# Altium PCB Sound_Sensor_v3.1.PcbDoc (part 3 of 3)
Units mm, origin at the board's own origin, x right, y up, seen from the top; angles counter-clockwise.
Board outline 69.99 x 68.25 mm, 2 copper layers (Top Layer, Bottom Layer), stack 1.448 mm thick; 83 components, 60 nets, 303 pads, 87 vias.
Unrouted connection lines stored in the file: 2.
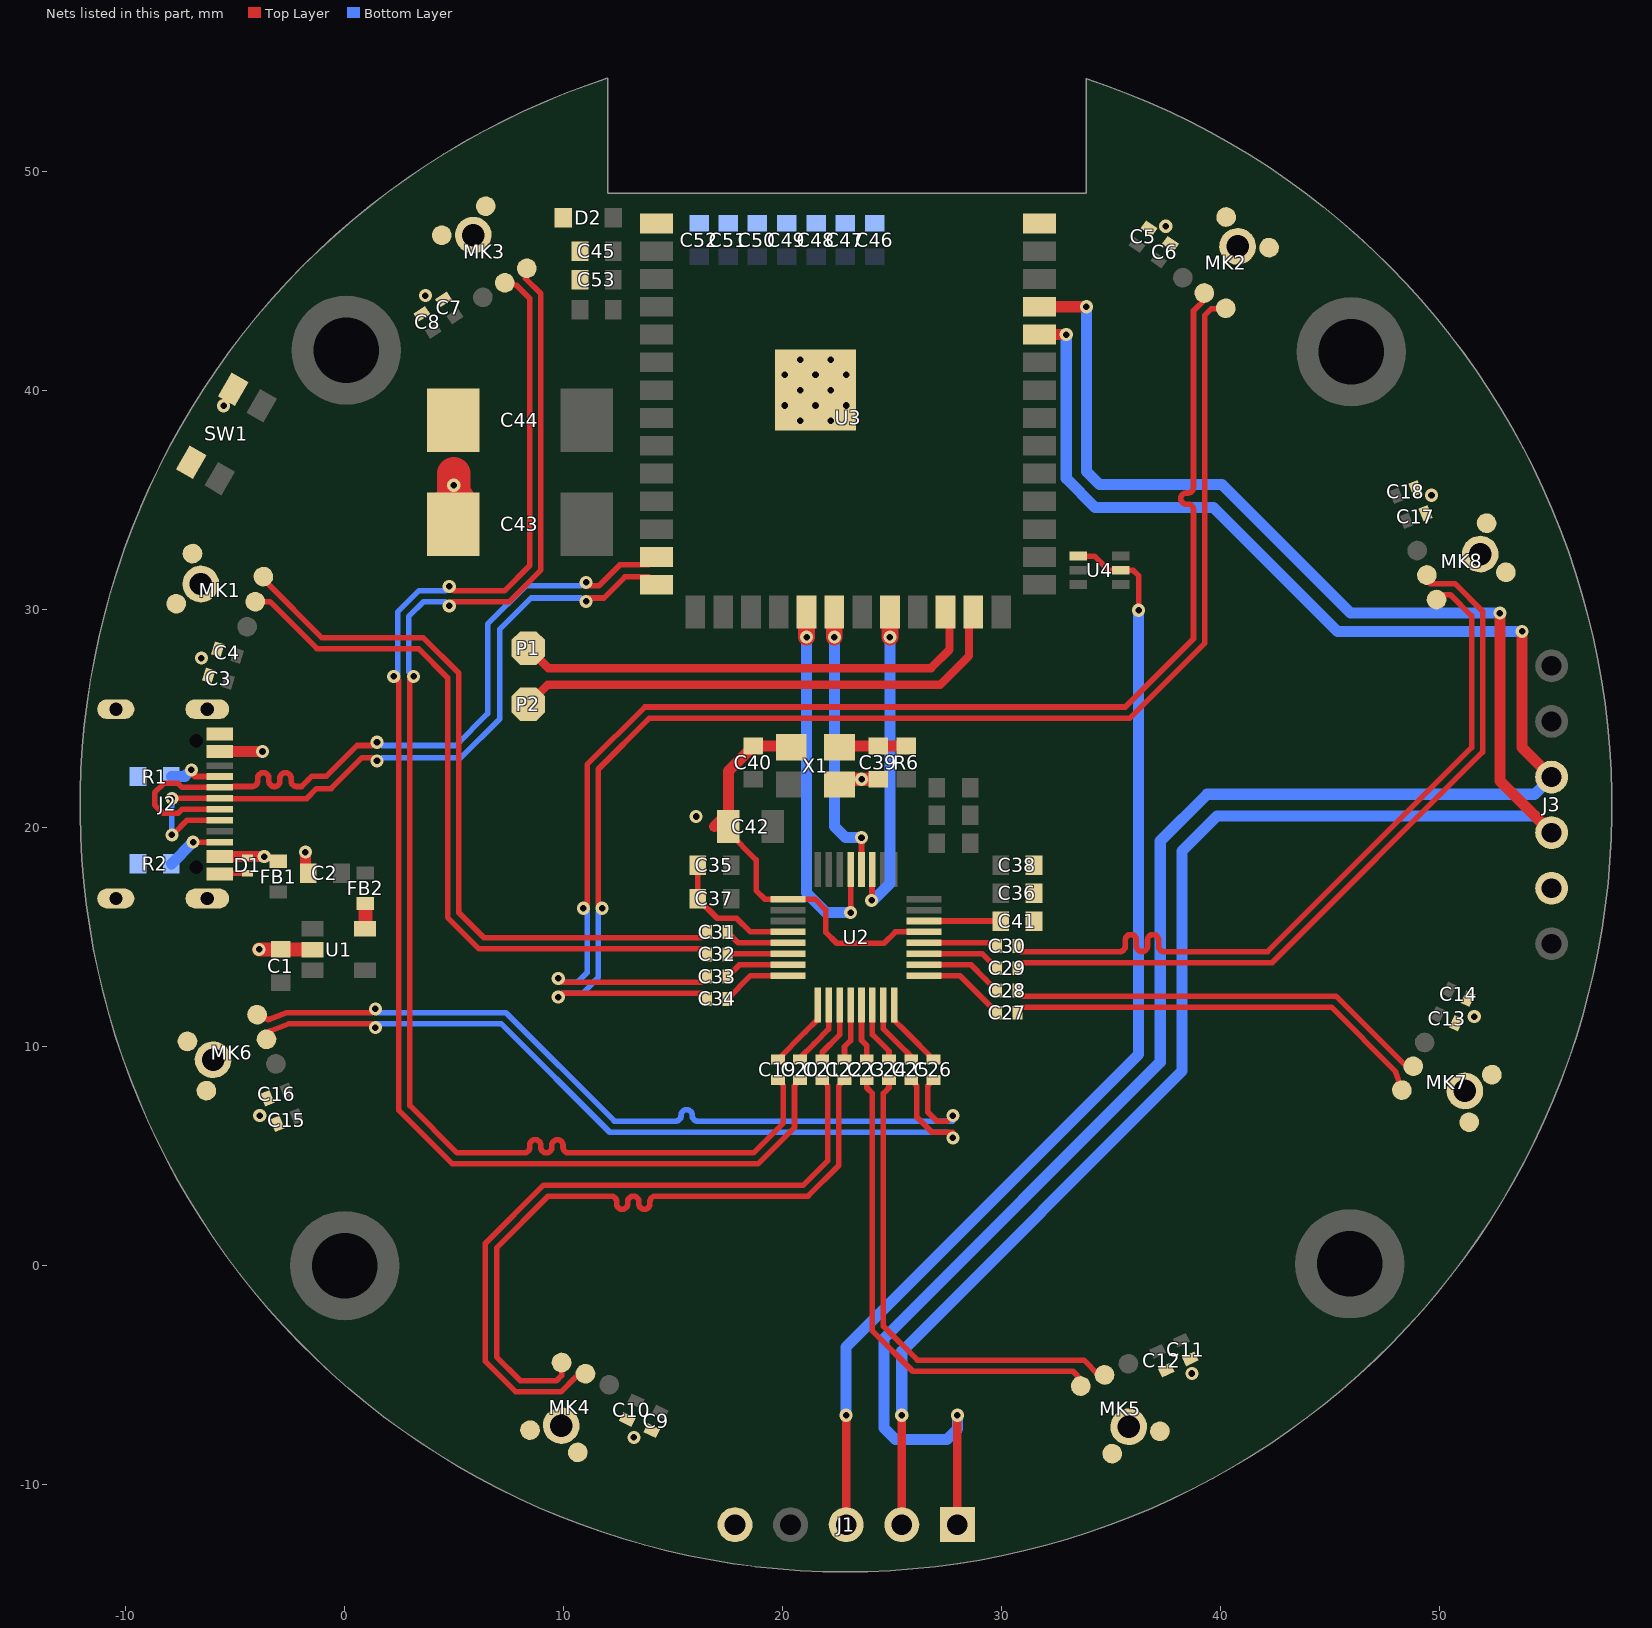
[diagram p2: the nets of this part, all layers, seen from the top]

## Via types
v1: diameter 0.6, hole 0.3, Top Layer to Bottom Layer, 87 vias

## Nets (pads, with @x,y where several pads share a name; then routed paths per layer and width w, separated by ;. In a path a pad name is that pad's centre, name@x,y a point inside that pad or via, vN(x,y) a via of type N, cw(c..) or ccw(c..) an arc to the next point about the centre after c; other vN are vias at no path point) (continued)
GND: C1.2 C2.2 C3.2 C4.2 C5.2 C6.2 C7.2 C8.2 C9.2 C10.2 C11.2 C12.2 C13.2 C14.2 C15.2 C16.2 C17.2 C18.2 C35.2 C36.2 C37.2 C38.2 C39.1 C40.1 C41.2 C42.1 C43.2 C44.2 C45.2 C46.2 C47.2 C48.2 C49.2 C50.2 C51.2 C52.2 C53.2 D1.1 D2.2 J1.5 J2.A1/B12 J2.B1/A12 J2.S1 J2.S2 J2.S3 J2.S4 J3.5 MK1.2 MK1.3 MK1.4 MK2.2 MK2.3 MK2.4 MK3.2 MK3.3 MK3.4 MK4.2 MK4.3 MK4.4 MK5.2 MK5.3 MK5.4 MK6.2 MK6.3 MK6.4 MK7.2 MK7.3 MK7.4 MK8.2 MK8.3 MK8.4 R1.1 R2.1 SW1.2 U1.2 U2.13 U2.25 U2.28 U3.1 U3.40 U3.41 X1.2 X1.4 | length 34.5
  Top Layer w0.254: J2.B1/A12@-5.712,17.902 -5.676,17.938 D1.1@-4.445,17.938 ; MK4.3@9.891,-7.307 MK4.3@9.891,-7.076 ; C35.2@16.129,18.288 C37.2@16.129,16.764 17.018,15.875 17.907,15.875 18.532,15.25 U2.28@20.26,15.25 ; C42.1@17.526,20.066 17.526,19.812 18.796,18.542 18.796,17.145 19.191,16.75 U2.25@20.26,16.75 21.477,16.75 21.971,16.256 21.971,15.24 22.479,14.732 24.638,14.732 25.156,15.25 U2.13@26.46,15.25 ; U3.41@21.463,40.005 U3.41@21.5,40.005
  Top Layer w0.508: v1(-1.803,18.898) -1.803,18.059 C2.2@-1.676,17.932 ; 16.891,20.066 17.526,20.701 17.526,22.606 C40.1@18.669,23.749 20.343,23.749 X1.2@20.406,23.686
  Top Layer w0.635: v1(-3.912,14.453) C1.2@-2.921,14.453 -1.484,14.453 U1.2@-1.473,14.442 ; X1.4@22.606,21.986 22.845,22.225 v1(23.615,22.225) C39.1@24.384,22.225
  Top Layer w1.524: C43.2@4.659,34.76 4.659,34.176 C43.2@4.951,33.884 ; 4.978,36.195 4.978,35.23 C43.2@5.156,35.052
  other v1: 13.208,-7.849 38.71,-4.928 -3.886,6.858 51.613,11.379 16.053,20.523 -6.553,27.762 49.657,35.204 4.978,35.662 20.808,38.605 22.208,38.605 -5.537,39.294 20.108,39.305 21.508,39.305 22.908,39.305 20.808,40.005 22.208,40.005 20.108,40.705 21.508,40.705 22.908,40.705 20.808,41.405 22.208,41.405 3.683,44.323 37.516,47.498
IO19: P1.1 U3.24 | length 21.8
  Top Layer w0.381: P1.1@8.382,28.219 9.296,27.305 26.797,27.305 27.635,28.143 27.635,29.68 U3.24@27.45,29.865
IO20: P2.1 U3.25 | length 23.1
  Top Layer w0.381: P2.1@8.382,25.654 9.271,26.543 27.203,26.543 28.524,27.864 28.524,29.669 U3.25@28.72,29.865
MIC_OUTS.OUT1_N: C32.1 MK1.6 | length 33.7
  Top Layer w0.254: MK1.6@-4.09,30.341 -3.417,30.341 -1.27,28.194 3.371,28.194 4.699,26.866 4.699,15.919 6.14,14.478 16.294,14.478 C32.1@16.548,14.224
MIC_OUTS.OUT1_P: C31.1 MK1.1 | length 33.7
  Top Layer w0.254: MK1.1@-3.718,31.486 -3.588,31.231 -1.06,28.702 3.581,28.702 5.207,27.076 5.207,16.129 6.35,14.986 16.294,14.986 C31.1@16.548,15.24
MIC_OUTS.OUT2_N: C33.1 MK2.6 | length 65
  Top Layer w0.254: v1(9.754,13.127) 9.927,12.954 16.294,12.954 C33.1@16.548,13.208 ; v1(10.906,16.332) 11.074,16.5 11.074,22.893 13.709,25.527 35.662,25.527 38.781,28.646 38.781,34.417 38.781,34.544 ccw(c38.527,34.544) 38.527,34.798 38.451,34.798 cw(c38.451,35.052) 38.451,35.306 38.527,35.306 ccw(c38.527,35.56) 38.781,35.56 38.781,36.321 38.781,43.632 39.321,44.173 MK2.6@39.276,44.445
  Bottom Layer w0.254: v1(9.754,13.127) 9.927,12.954 10.643,12.954 11.079,13.391 11.079,16.159 v1(10.906,16.332)
MIC_OUTS.OUT2_P: C34.1 MK2.1 | length 64.8
  Top Layer w0.254: v1(9.754,12.273) 9.927,12.446 16.294,12.446 C34.1@16.548,12.192 ; v1(11.76,16.332) 11.582,16.51 11.582,22.682 13.919,25.019 35.872,25.019 39.289,28.436 39.289,43.422 39.583,43.716 40.079,43.716 MK2.1@40.256,43.745 MK2.1@40.342,43.745
  Bottom Layer w0.254: v1@9.927,12.446 10.853,12.446 11.587,13.18 11.587,16.159 v1(11.76,16.332)
MIC_OUTS.OUT3_N: C20.1 MK3.6 | length 65.4
  Top Layer w0.254: v1@2.464,26.751 2.464,7.105 4.92,4.648 18.879,4.648 20.549,6.317 20.549,8.23 C20.1@20.803,8.484 ; v1(4.775,31.039) 4.978,30.836 7.29,30.836 8.453,31.999 8.453,44.201 7.854,44.8 MK3.6@7.315,44.91
  Bottom Layer w0.254: v1@2.291,26.924 2.413,27.046 2.413,29.865 3.396,30.848 4.585,30.848 v1(4.775,31.039)
  other v1: 2.235,26.924
MIC_OUTS.OUT3_P: C19.1 MK3.1 | length 65.8
  Top Layer w0.254: v1(3.145,26.924) 2.972,26.751 2.972,7.315 5.131,5.156 7.686,5.156 8.193,5.156 ccw(c8.193,5.41) 8.447,5.41 8.447,5.501 cw(c8.701,5.501) 8.955,5.501 8.955,5.41 ccw(c9.209,5.41) 9.463,5.41 9.463,5.501 cw(c9.717,5.501) 9.971,5.501 9.971,5.41 ccw(c10.225,5.41) 10.225,5.156 10.86,5.156 18.669,5.156 20.041,6.528 20.041,8.23 C19.1@19.787,8.484 ; v1@4.775,30.185 4.918,30.328 7.5,30.328 8.961,31.789 8.961,44.411 8.259,45.114 8.259,45.374 8.283,45.398 MK3.1@8.319,45.574
  Bottom Layer w0.254: v1(3.145,26.924) 2.921,27.148 2.921,29.654 3.607,30.34 4.585,30.34 v1(4.775,30.15)
MIC_OUTS.OUT4_N: C21.1 MK4.6 | length 31.8
  Top Layer w0.254: MK4.6@10.997,-4.936 10.546,-5.1 9.881,-5.766 7.816,-5.766 6.426,-4.376 6.426,1.023 9.086,3.683 20.955,3.683 22.073,4.801 22.073,8.23 C21.1@21.819,8.484
MIC_OUTS.OUT4_P: C22.1 MK4.1 | length 31.8
  Top Layer w0.254: MK4.1@9.905,-4.427 9.905,-5.023 9.67,-5.258 8.026,-5.258 6.934,-4.166 6.934,0.813 9.296,3.175 11.532,3.175 12.167,3.175 cw(c12.167,2.921) 12.421,2.921 12.421,2.827 ccw(c12.675,2.827) 12.929,2.827 12.929,2.921 cw(c13.183,2.921) 13.437,2.921 13.437,2.827 ccw(c13.691,2.827) 13.945,2.827 13.945,2.921 cw(c14.199,2.921) 14.199,3.175 15.022,3.175 21.165,3.175 22.581,4.59 22.581,8.23 C22.1@22.835,8.484
MIC_OUTS.OUT5_N: C24.1 MK5.6 | length 22.4
  Top Layer w0.254: C24.1@24.867,8.484 24.867,8.128 24.613,7.874 24.613,-2.769 26.162,-4.318 33.773,-4.318 34.447,-4.992 MK5.6@34.716,-4.992
MIC_OUTS.OUT5_P: C23.1 MK5.1 | length 22.4
  Top Layer w0.254: C23.1@23.851,8.484 23.851,8.128 24.105,7.874 24.105,-2.979 25.952,-4.826 33.274,-4.826 33.711,-5.263 MK5.1@33.625,-5.501
MIC_OUTS.OUT6_N: C25.1 MK6.6 | length 38
  Top Layer w0.254: MK6.6@-3.577,10.343 -3.406,10.728 -2.569,11.049 1.224,11.049 v1(1.397,10.876) ; C25.1@25.883,8.484 26.137,8.23 26.137,6.8 26.841,6.096 27.788,6.096 v1(27.788,5.842)
  Bottom Layer w0.254: v1(1.397,10.876) 1.397,10.944 1.502,11.049 7.156,11.049 12.109,6.096 27.534,6.096 v1(27.788,5.842)
MIC_OUTS.OUT6_P: C26.1 MK6.1 | length 38
  Top Layer w0.254: MK6.1@-4.009,11.467 -3.494,11.238 -2.664,11.557 1.224,11.557 v1(1.397,11.73) ; C26.1@26.899,8.484 26.645,8.23 26.645,7.01 27.051,6.604 27.534,6.604 v1(27.788,6.858)
  Bottom Layer w0.254: v1(1.397,11.73) 1.397,11.662 1.502,11.557 7.366,11.557 12.319,6.604 14.593,6.604 15.113,6.604 ccw(c15.113,6.858) 15.367,6.858 15.367,6.874 cw(c15.621,6.874) 15.875,6.874 15.875,6.858 ccw(c16.129,6.858) 16.129,6.604 16.764,6.604 27.788,6.604 v1(27.788,6.858)
MIC_OUTS.OUT7_N: C28.1 MK7.6 | length 19.6
  Top Layer w0.254: C28.1@30.734,12.573 30.988,12.319 45.288,12.319 48.583,9.024 MK7.6@48.823,9.109
MIC_OUTS.OUT7_P: C27.1 MK7.1 | length 19.5
  Top Layer w0.254: C27.1@30.734,11.557 30.988,11.811 45.078,11.811 47.997,8.892 MK7.1@48.305,8.022
MIC_OUTS.OUT8_N: C29.1 MK8.6 | length 35.2
  Top Layer w0.254: C29.1@30.734,13.589 30.734,13.678 30.899,13.843 32.967,13.843 42.374,13.843 51.994,23.462 51.994,29.794 51.994,29.903 50.731,31.166 49.599,31.166 MK8.6@49.444,31.558
MIC_OUTS.OUT8_P: C30.1 MK8.1 | length 35.1
  Top Layer w0.254: C30.1@30.734,14.605 30.734,14.516 30.899,14.351 34.864,14.351 35.409,14.351 ccw(c35.409,14.605) 35.663,14.605 35.663,14.877 cw(c35.917,14.877) 36.171,14.877 36.171,14.605 ccw(c36.425,14.605) 36.679,14.605 36.679,14.877 cw(c36.933,14.877) 37.187,14.877 37.187,14.605 ccw(c37.441,14.605) 37.441,14.351 38.076,14.351 42.164,14.351 51.486,23.673 51.486,29.693 50.521,30.658 50.106,30.658 MK8.1@49.886,30.438
MISO: U2.20 U3.20 | length 12.7
  Top Layer w0.254: U2.20@23.61,18.1 v1(23.61,19.558)
  Top Layer w0.762: v1(22.37,28.72) U3.20@22.37,29.865
  Bottom Layer w0.508: v1(22.37,28.72) 22.37,20.073 22.885,19.558 v1(23.61,19.558)
MOSI: U2.21 U3.19 | length 17.2
  Top Layer w0.254: v1(23.11,16.133) U2.21@23.11,18.1
  Top Layer w0.762: v1(21.1,28.72) U3.19@21.1,29.865
  Bottom Layer w0.508: v1(21.1,28.72) 21.1,17.025 21.992,16.133 v1(23.11,16.133)
NetC19_2: C19.2 U2.1 | length 3.2
  Top Layer w0.254: C19.2@19.787,9.423 21.031,10.668 21.61,11.247 U2.1@21.61,11.9
NetC20_2: C20.2 U2.2 | length 3
  Top Layer w0.254: C20.2@20.803,9.423 20.803,9.5 21.463,10.16 22.11,10.807 U2.2@22.11,11.9
NetC21_2: C21.2 U2.3 | length 2.8
  Top Layer w0.254: C21.2@21.819,9.423 21.819,9.754 22.61,10.545 U2.3@22.61,11.9
NetC22_2: C22.2 U2.4 | length 2.6
  Top Layer w0.254: C22.2@22.835,9.423 22.835,10.008 23.11,10.283 U2.4@23.11,11.9
NetC23_2: C23.2 U2.5 | length 2.6
  Top Layer w0.254: U2.5@23.61,11.9 23.61,10.299 23.851,10.058 C23.2@23.851,9.423
NetC24_2: C24.2 U2.6 | length 2.8
  Top Layer w0.254: U2.6@24.11,11.9 24.11,10.561 24.867,9.804 C24.2@24.867,9.423
NetC25_2: C25.2 U2.7 | length 3
  Top Layer w0.254: U2.7@24.61,11.9 24.61,10.823 25.26,10.173 25.883,9.55 C25.2@25.883,9.423
NetC26_2: C26.2 U2.8 | length 3.2
  Top Layer w0.254: U2.8@25.11,11.9 25.11,11.212 25.654,10.668 C26.2@26.899,9.423
NetC27_2: C27.2 U2.9 | length 4
  Top Layer w0.254: U2.9@26.46,13.25 28.101,13.25 28.651,12.7 C27.2@29.794,11.557
NetC28_2: C28.2 U2.10 | length 3.8
  Top Layer w0.254: U2.10@26.46,13.75 28.617,13.75 29.286,13.081 C28.2@29.794,12.573
NetC29_2: C29.2 U2.11 | length 3.6
  Top Layer w0.254: U2.11@26.46,14.25 28.168,14.25 29.133,14.25 C29.2@29.794,13.589
NetC30_2: C30.2 U2.12 | length 3.4
  Top Layer w0.254: U2.12@26.46,14.75 29.649,14.75 C30.2@29.794,14.605
NetC31_2: C31.2 U2.29 | length 3
  Top Layer w0.254: C31.2@17.488,15.24 17.978,14.75 U2.29@20.26,14.75
NetC32_2: C32.2 U2.30 | length 2.8
  Top Layer w0.254: C32.2@17.488,14.224 17.514,14.25 U2.30@20.26,14.25
NetC33_2: C33.2 U2.31 | length 3
  Top Layer w0.254: C33.2@17.488,13.208 18.03,13.75 U2.31@20.26,13.75
NetC34_2: C34.2 U2.32 | length 3.2
  Top Layer w0.254: C34.2@17.488,12.192 18.546,13.25 19.6,13.25 U2.32@20.26,13.25
NetC39_2: C39.2 R6.2 X1.1 | length 3.2
  Top Layer w0.508: X1.1@22.606,23.686 cw(c22.669,23.686) 22.669,23.749 C39.2@24.384,23.749 R6.2@25.654,23.749 R6.2@25.591,23.812
NetFB2_1: FB2.1 U1.5 | length 0.9
  Top Layer w0.381: U1.5@0.94,15.405 U1.5@0.927,15.392 U1.5@0.952,15.367
  Top Layer w0.635: U1.5@0.94,15.405 FB2.1@0.94,16.247
NetJ2_A5: J2.A5 R1.2 | length 2.7
  Top Layer w0.254: v1(-7.01,22.657) -7.061,22.657 -7.112,22.606 -6.858,22.352 J2.A5@-5.712,22.352
  Bottom Layer w0.508: R1.2@-7.925,22.352 -7.315,22.352 v1(-7.01,22.657)
NetJ2_B5: J2.B5 R2.2 | length 2.6
  Top Layer w0.254: v1(-6.931,19.352) J2.B5@-5.712,19.352
  Bottom Layer w0.508: R2.2@-7.925,18.364 -6.937,19.352 v1(-6.931,19.352) v1@-6.934,19.355
REFIN: C41.1 U2.14 | length 3.5
  Top Layer w0.254: U2.14@26.46,15.75 29.97,15.75 C41.1@29.972,15.748
RTS: J1.3 U4.1 U4.5 | length 52
  Top Layer w0.254: U4.1@33.523,32.425 34.25,32.425 34.9,31.775 U4.5@35.463,31.775 36.024,31.775 36.271,31.528 v1(36.271,29.947)
  Top Layer w0.381: J1.3@22.911,-11.837 v1(22.911,-6.833)
  Bottom Layer w0.508: v1(22.911,-6.833) 22.911,-3.719 36.271,9.641 v1(36.271,29.947)
RX: J1.1 J3.3 U3.36 | length 99.3
  Top Layer w0.381: J1.1@27.991,-11.837 v1(27.991,-6.833)
  Top Layer w0.508: U3.36@31.75,42.545 v1(32.969,42.545) ; v1@53.797,29.007 v1(53.797,28.981) 53.797,23.673 J3.3@55.144,22.327
  Bottom Layer w0.508: v1(27.991,-6.833) 27.991,-7.468 27.508,-7.95 25.171,-7.95 24.638,-7.417 24.638,-3.327 37.262,9.296 37.262,19.406 39.395,21.539 54.356,21.539 J3.3@55.144,22.327 ; v1(32.969,42.545) 32.969,35.966 34.29,34.646 39.691,34.646 45.355,28.981 53.086,28.981 ; 53.111,28.981 v1(53.797,28.981)
SCLK: U2.19 U3.22 | length 15
  Top Layer w0.254: v1(24.073,16.694) 24.091,16.713 24.091,18.081 U2.19@24.11,18.1
  Top Layer w0.762: v1(24.91,28.72) U3.22@24.91,29.865
  Bottom Layer w0.508: v1(24.073,16.694) 24.142,16.694 24.905,17.457 24.91,17.457 v1(24.91,28.72)
TX: J1.2 J3.4 U3.37 | length 96.2
  Top Layer w0.381: J1.2@25.451,-11.837 v1(25.451,-6.833)
  Top Layer w0.508: U3.37@31.75,43.815 33.858,43.815 v1@33.884,43.84 ; v1(52.781,29.819) 52.781,22.149 J3.4@55.144,19.787
  Bottom Layer w0.508: v1(25.451,-6.833) 25.451,-3.912 38.252,8.89 38.252,18.948 39.853,20.549 54.382,20.549 J3.4@55.144,19.787 ; v1@33.884,43.84 33.884,36.297 34.493,35.687 40.081,35.687 45.949,29.819 v1(52.781,29.819)
  other v1: 33.884,43.815
USB.USB_N: J2.A7 J2.B7 U3.13 | length 35
  Top Layer w0.254: J2.A7@-5.712,20.852 -7.438,20.852 -7.617,20.673 -8.303,20.673 -8.687,21.057 -8.687,21.615 -8.268,22.034 -7.617,22.034 -7.435,21.852 J2.B7@-5.712,21.852 ; -5.08,21.895 -4.36,21.895 -4.233,21.895 ccw(c-4.233,22.149) -3.979,22.149 -3.979,22.272 cw(c-3.725,22.272) -3.471,22.272 -3.471,22.149 ccw(c-3.217,22.149) -2.963,22.149 -2.963,22.272 cw(c-2.709,22.272) -2.455,22.272 -2.455,22.149 ccw(c-2.201,22.149) -2.201,21.895 -1.979,21.895 -1.682,22.192 -1.518,22.356 -0.853,22.356 0.561,23.77 1.232,23.77 1.38,23.917 v1(1.473,23.917) ; v1(11.029,31.221) 11.183,31.067 11.608,31.067 12.571,32.029 13.894,32.029 U3.13@14.25,32.385
  Bottom Layer w0.254: v1(1.473,23.917) 1.567,23.917 1.714,23.77 5.075,23.77 6.528,25.222 6.528,29.314 8.28,31.067 10.78,31.067 10.935,31.221 v1(11.029,31.221)
USB.USB_P: J2.A6 J2.B6 U3.14 | length 32.6
  Top Layer w0.254: v1(-7.899,21.354) -7.883,21.37 -7.864,21.352 J2.A6@-5.712,21.352 ; v1@-7.874,19.685 -7.207,20.352 J2.B6@-5.712,20.352 ; -5.08,21.336 -1.748,21.336 -1.287,21.797 -0.622,21.797 0.792,23.211 1.232,23.211 1.38,23.063 v1(1.473,23.063) ; v1(11.024,30.353) 11.178,30.508 11.839,30.508 12.802,31.471 13.894,31.471 U3.14@14.25,31.115
  Bottom Layer w0.254: v1(-7.899,19.685) v1(-7.899,21.354) ; v1(1.473,23.063) 1.567,23.063 1.714,23.211 5.307,23.211 7.087,24.991 7.087,29.083 8.511,30.508 10.775,30.508 10.93,30.353 v1(11.024,30.353)
VBUS: D1.2 FB1.1 J2.A4/B9 J2.B4/A9 | length 3.9
  Top Layer w0.254: v1@-3.766,23.502 v1(-3.759,23.495)
  Top Layer w0.508: J2.B4/A9@-5.712,18.702 -4.445,18.702 v1@-3.785,18.702 ; J2.A4/B9@-5.712,23.502 v1@-3.766,23.502
  other v1: -3.683,18.694
pads on no net: J2.A8 J2.B8 J2.MH U1.4 U2.27 U3.4 U3.5 U3.6 U3.7 U3.8 U3.9 U3.10 U3.11 U3.12 U3.15 U3.16 U3.23 U3.26 U3.28 U3.29 U3.30 U3.31 U3.32 U3.33 U3.34 U3.35 U3.38 U3.39

## Polygon pours and split planes (outlines as drawn)
no net on Bottom Overlay "NONET_L-01_P-001" (solid): 20.629,6.272 cw(c17.491,-3.963) 27.945,-1.653 cw(c37.111,-5.077) 30.998,2.564 30.993,2.589 30.634,5.637 28.248,3.097 28.224,3.072 ccw(c7.654,-13.269) 22.827,8.177
no net on Bottom Overlay "NONET_L-01_P-001" (solid): 23.62,-2.315 ccw(c26.878,2.498) 21.082,2.921 21.64,2.868 cw(c26.878,2.498) 24.269,-2.059
GND on Top Layer "GND_L01_P003" (solid, remove dead copper, pour order 3): 11.455,53.473 ccw(c22.928,20.991) 34.442,53.458 34.442,48.498 11.455,48.498
GND on Bottom Layer "GND_L02_P002" (solid, remove dead copper, pour order 2): 11.43,53.489 ccw(c22.903,21.007) 34.417,53.474 34.417,48.514 11.43,48.514

## Other copper
Top Layer:
  rectangle net VBUS: -3.683,18.18 -2.648,18.999
  rectangle net GND: -5.969,16.582 -5.531,17.704
  region net GND: 38.471,47.296 37.084,48.285 36.439,47.381 37.826,46.392
  region net GND: 50.308,34.506 49.683,36.091 48.718,35.711 49.342,34.125
  region net GND: 37.719,-5.74 39.263,-5.02 38.794,-4.014 37.25,-4.734
  region net 3V3: 35.727,-4.631 38.548,-3.316 38.079,-2.31 35.258,-3.625
  region net GND: 53.12,32.817 52.992,33.142 51.052,32.378 51.18,32.053
  region net GND: 9.253,-8.094 9.7,-8.302 10.454,-6.686 10.007,-6.478
  region net 3V3: 49.258,10.041 50.614,12.884 49.612,13.362 48.256,10.519
  region net 3V3: 11.862,-5.41 14.728,-6.747 15.197,-5.74 12.331,-4.404
  region net 3V3: -1.03,6.925 -2.149,9.841 -3.213,9.433 -2.094,6.516
  region net 3V3: -4.43,29.357 -5.404,26.359 -4.391,26.03 -3.417,29.028
  region net 3V3: 6.488,44.33 3.779,42.537 4.392,41.611 7.101,43.404
  region net 3V3: 49.118,32.496 47.939,35.489 46.755,35.023 47.934,32.03
  region net 3V3: 38.436,45.039 35.943,46.817 35.298,45.913 37.791,44.135
  region net GND: -5.406,39.941 -7.08,37.04 -6.715,36.829 -5.04,39.729
  region net "DEBUG SIG.ENABLE": -4.15,39.122 -5.825,36.221 -5.454,36.007 -3.779,38.908
  rectangle net GND: -5.969,24.5 -5.531,25.497
  region net GND: 16.311,18.732 17.03,19.451 16.491,19.99 15.773,19.271
  rectangle net GND: 15.748,19.304 18.034,20.828
  rectangle net GND: 15.748,16.319 16.51,20.828
  rectangle net 3V3: 28.194,16.713 30.353,22.098
  rectangle net 3V3: 29.591,17.018 30.353,18.288
  rectangle net GND: 3.988,33.325 5.918,39.243
  rectangle net 3V3: 10.084,33.172 12.014,39.091
  region net GND: -6.611,28.646 -7.137,27.026 -6.161,26.708 -5.634,28.329
  region net GND: -2.827,6.341 -3.438,7.932 -4.549,7.505 -3.938,5.914
  region net GND: 12.294,-7.772 13.838,-8.493 14.307,-7.486 12.763,-6.766
  region net GND: 51.528,10.46 52.261,11.998 51.259,12.476 50.526,10.938
  region net GND: 7.639,-8.043 10.764,-9.5 11.517,-7.884 8.392,-6.427
  region net GND: 51.936,5.696 53.436,8.84 50.577,10.204 49.077,7.059
  region net GND: 34.934,-9.593 38.092,-8.121 36.753,-5.25 33.595,-6.722
  region net GND: -8.181,10.443 -6.932,7.19 -3.975,8.325 -5.224,11.578
  region net GND: -7.605,33.325 -8.682,30.011 -5.669,29.032 -4.592,32.346
  region net GND: 54.034,31.515 52.77,34.723 50.83,33.959 52.094,30.75
  region net GND: 6.417,49.428 3.511,47.505 5.259,44.864 8.165,46.787
  region net GND: 4.216,45.061 2.795,44.12 3.408,43.194 4.829,44.135
  region net GND: 43.165,46.894 40.328,48.917 38.502,46.357 41.338,44.334
  rectangle net 5V: -3.454,15.367 -0.279,16.942
  rectangle net 3V3: -0.533,17.947 1.346,19.202
  rectangle net 5V: -3.378,12.548 -0.279,13.36
Bottom Layer:
  rectangle net VBUS: -4.293,18.237 -3.226,23.927

## Silkscreen, mask and mechanical layers (free items; w line width, h text height)
Top Overlay:
  lines w0.127: -1.372,17.399 -0.457,17.399 ; -1.372,18.466 -1.016,18.466 ; -0.508,19.685 -1.016,19.685 -1.016,18.542 -1.016,18.466 ; -0.457,18.466 -1.016,18.466 ; 8.814,47.295 8.814,46.615 10.262,46.615 ; 9.322,44.577 9.322,45.013 10.236,45.013 ; 11.112,48.616 11.112,49.136 ; 11.506,42.469 11.506,43.155 ; 15.138,16.942 15.646,16.942 15.646,16.764 ; 15.57,15.443 16.231,15.443 16.231,15.24 ; 15.85,14.122 16.231,14.122 16.231,14.224 ; 15.926,13.056 16.231,13.056 16.231,13.208 ; 16.764,21.717 17.399,21.717 17.399,20.93 17.424,20.93 ; 17.805,12.192 18.364,12.192 18.364,11.608 ; 18.567,7.849 18.567,8.42 19.38,8.42 ; 21.819,8.166 21.869,8.166 21.869,4.902 ; 23.851,8.166 23.901,8.166 23.901,4.902 ; 26.063,7.747 26.063,8.166 ; 26.873,8.166 26.899,8.166 ; 27.305,8.42 28.092,8.42 ; 28.679,22.377 28.702,22.377 28.702,22.733 29.464,22.733 ; 29.032,19.52 29.464,19.52 ; 29.032,20.889 29.439,20.889 ; 31.051,13.462 34.544,13.462 ; 31.051,14.385 31.051,14.351 31.42,14.351
  lines w0.254: 3.81,23.876 10.414,23.876 10.414,29.718 3.81,29.718 3.81,23.876 ; 16.51,-13.107 29.261,-13.107 29.261,-6.096 16.51,-6.096 16.51,-13.107 ; 49.124,13.437 56.464,13.437 56.464,28.702 49.124,28.702 49.124,13.437
  text "EN" at 51.003,26.772 h1.52
  text "IO_0" at 50.595,24.087 h1.52
  text "RX" at 51.601,21.692 h1.52
  text "TEST POINTs" at 3.048,20.066 h2.29
  text "TX" at 51.682,19.075 h1.52
  text "DEBUG" at 49.251,17.018 h2.29 r90
  text "GND" at 50.495,16.459 h1.52
  text "3V3" at 50.978,13.919 h1.52
  text "USB" at -7.823,11.811 h2.29 r90
  text "PROGRAMMING" at 15.001,-6.291 h2.29
  text "GND" at 18.509,-10.549 h1.52 r90
  text "DTR" at 21.049,-10.549 h1.52 r90
  text "RTS" at 23.589,-10.549 h1.52 r90
  text "TX" at 26.129,-10.549 h1.52 r90
  text "RX" at 28.669,-10.549 h1.52 r90
Bottom Overlay:
  lines w0.127: 28.224,3.072 ccw(c7.655,-13.269) 22.827,8.177 20.629,6.272 cw(c17.491,-3.963) 27.945,-1.653 cw(c37.111,-5.077) 30.998,2.564 ; 28.248,3.097 30.634,5.637 30.993,2.589 ; 21.082,2.921 cw(c26.878,2.498) 23.62,-2.315 24.269,-2.059 ccw(c26.878,2.498) 21.64,2.868 21.082,2.921
  lines w0.254: 16.51,-13.106 29.261,-13.106 29.261,-10.566 16.51,-10.566 16.51,-13.106 ; 53.874,13.386 56.464,13.386 56.464,28.677 53.874,28.677 53.874,13.386
  text "EN" at 53.874,26.772 h1.52
  text "IO_0" at 53.874,24.113 h1.52
  text "RX" at 53.874,21.692 h1.52
  text "TX" at 53.874,19.101 h1.52
  text "GND" at 53.874,16.434 h1.52
  text "3V3" at 53.874,13.894 h1.52
  text "RoHS" at 24.935,0.33 h6
  text "compliant" at 24.859,-1.733 h3.2
  text "ZERO CARBON FOOTPRINT" at 33.647,-4.879 h1.02
  text "GND" at 16.959,-10.473 h1.52 r270
  text "DTR" at 19.55,-10.473 h1.52 r270
  text "RTS" at 22.065,-10.473 h1.52 r270
  text "TX" at 24.63,-10.473 h1.52 r270
  text "RX" at 27.17,-10.473 h1.52 r270
DIMENSION:
  text "PCB Diameter" at -60.408,6.67 h6
BOARD OUTLINE:
  the board outline again, w0.254
FABRICATION:
  drawing of 191 lines, arcs and shapes, not listed
  text "Layer" at -34.916,83.82 h1.52
  text "Name" at -24.505,83.82 h1.52
  text "Material" at -0.889,83.82 h1.52
  text "Thickness" at 20.949,83.82 h1.52
  text "Constant" at 37.455,83.82 h1.52
  text "Board Layer Stack" at 51.929,83.82 h1.52
  text "Top Overlay" at -24.505,80.772 h1.52
  text "Top Solder" at -24.505,77.724 h1.52
  text "Solder Resist" at -0.889,77.724 h1.52
  text "0.076mm" at 20.949,77.724 h1.52
  text "3.5" at 37.455,77.724 h1.52
  text "1" at -34.916,74.676 h1.52
  text "Top Layer" at -24.505,74.676 h1.52
  text "0.254mm" at 20.949,74.676 h1.52
  text "Dielectric 1" at -24.505,71.628 h1.52
  text "FR-4" at -0.889,71.628 h1.52
  text "0.940mm" at 20.949,71.628 h1.52
  text "4.8" at 37.455,71.628 h1.52
  text "2" at -34.916,68.58 h1.52
  text "Bottom Layer" at -24.505,68.58 h1.52
  text "0.254mm" at 20.949,68.58 h1.52
  text "Bottom Solder" at -24.505,65.532 h1.52
  text "Solder Resist" at -0.889,65.532 h1.52
  text "0.076mm" at 20.949,65.532 h1.52
  text "3.5" at 37.455,65.532 h1.52
  text "Bottom Overlay" at -24.505,62.484 h1.52
  text "Total board thickness:" at -34.916,59.436 h1.52
  text "1.600mm" at 20.949,59.436 h1.52
Drill Drawing:
  circle w0.254: c-34.427,102.826 r0.847
  lines w0.254: -35.273,98.17 -33.58,98.17 -33.58,99.863 -35.273,99.863 -35.273,98.17 ; -35.273,106.213 -34.85,106.213 -34.427,105.79 -34.003,106.213 -33.58,106.213 -34.003,106.636 -33.58,107.06 -34.003,107.06 -34.427,107.483 -34.85,107.06 -35.273,107.06 -34.85,106.636 -35.273,106.213 ; -35.273,109.6 -34.427,110.023 -33.58,109.6 -34.003,110.446 -33.58,111.293 -34.427,110.87 -35.273,111.293 -34.85,110.446 -35.273,109.6 ; -35.273,113.41 -35.273,113.833 -34.85,114.256 -35.273,114.68 -35.273,115.103 -34.85,115.103 -34.427,114.68 -34.003,115.103 -33.58,115.103 -33.58,114.68 -34.003,114.256 -33.58,113.833 -33.58,113.41 -34.003,113.41 -34.427,113.833 -34.85,113.41 -35.273,113.41 ; -35.273,118.066 -34.427,117.22 -33.58,118.066 -34.427,118.913 -35.273,118.066 ; -35.273,121.03 -33.58,121.03 -33.58,122.723 -35.273,122.723 -35.273,121.03 ; -35.273,125.263 -34.85,125.263 -34.85,124.84 -34.003,124.84 -34.003,125.263 -33.58,125.263 -33.58,126.11 -34.003,126.11 -34.003,126.533 -34.85,126.533 -34.85,126.11 -35.273,126.11 -35.273,125.263 ; -34.935,121.368 -33.919,121.368 -33.919,122.384 -34.935,122.384 -34.935,121.368
  lines w0.381: -36.792,97.027 216.122,97.027 ; -36.792,127.507 216.122,127.507 ; -22.8,93.217 -22.8,131.317 ; -8.072,93.217 -8.072,131.317 ; 20.368,93.217 20.368,131.317 ; 33.217,93.217 33.217,131.317 ; 51.856,93.217 51.856,131.317 ; 89.945,93.217 89.945,131.317 ; 104.927,93.217 104.927,131.317 ; 123.87,93.217 123.87,131.317 ; 152.818,93.217 152.818,131.317 ; 180.495,93.217 180.495,131.317 ; -36.792,93.217 216.122,93.217 216.122,131.317 -36.792,131.317 -36.792,93.217
  text "Symbol" at -34.506,128.65 h1.83
  text "Count" at -21.657,128.65 h1.83
  text "Hole Size" at -6.929,128.65 h1.83
  text "Plated" at 21.511,128.65 h1.83
  text "Hole Type" at 34.36,128.65 h1.83
  text "Drill Layer Pair" at 52.999,128.65 h1.83
  text "Via/Pad" at 91.088,128.65 h1.83
  text "Pad Shape" at 106.07,128.65 h1.83
  text "Template" at 125.013,128.65 h1.83
  text "Hole Length" at 153.961,128.65 h1.83
  text "Routed Path Length" at 181.638,128.65 h1.83
  text "87" at -21.657,124.84 h1.52
  text "11.81mil (0.300mm)" at -6.929,124.84 h1.52
  text "PTH" at 21.511,124.84 h1.52
  text "Round" at 34.36,124.84 h1.52
  text "Top Layer - Bottom Layer" at 52.999,124.84 h1.52
  text "Via" at 91.088,124.84 h1.52
  text "Rounded" at 106.07,124.84 h1.52
  text "v60h30" at 125.013,124.84 h1.52
  text "-" at 153.961,124.84 h1.52
  text "-" at 181.638,124.84 h1.52
  text "2" at -21.657,121.03 h1.52
  text "23.62mil (0.600mm)" at -6.929,121.03 h1.52
  text "PTH" at 21.511,121.03 h1.52
  text "Slot" at 34.36,121.03 h1.52
  text "Top Layer - Bottom Layer" at 52.999,121.03 h1.52
  text "Pad" at 91.088,121.03 h1.52
  text "Rounded" at 106.07,121.03 h1.52
  text "r90_170h60_140r100" at 125.013,121.03 h1.52
  text "55.12mil (1.400mm)" at 153.961,121.03 h1.52
  text "31.50mil (0.800mm)" at 181.638,121.03 h1.52
  text "2" at -21.657,117.22 h1.52
  text "23.62mil (0.600mm)" at -6.929,117.22 h1.52
  text "PTH" at 21.511,117.22 h1.52
  text "Slot" at 34.36,117.22 h1.52
  text "Top Layer - Bottom Layer" at 52.999,117.22 h1.52
  text "Pad" at 91.088,117.22 h1.52
  text "Rounded" at 106.07,117.22 h1.52
  text "(Mixed)" at 125.013,117.22 h1.52
  text "66.93mil (1.700mm)" at 153.961,117.22 h1.52
  text "43.31mil (1.100mm)" at 181.638,117.22 h1.52
  text "2" at -21.657,113.41 h1.52
  text "24.41mil (0.620mm)" at -6.929,113.41 h1.52
  text "NPTH" at 21.511,113.41 h1.52
  text "Round" at 34.36,113.41 h1.52
  text "Top Layer - Bottom Layer" at 52.999,113.41 h1.52
  text "Pad" at 91.088,113.41 h1.52
  text "Rounded" at 106.07,113.41 h1.52
  text "c0hn62" at 125.013,113.41 h1.52
  text "-" at 153.961,113.41 h1.52
  text "-" at 181.638,113.41 h1.52
  text "6" at -21.657,109.6 h1.52
  text "35.43mil (0.900mm)" at -6.929,109.6 h1.52
  text "PTH" at 21.511,109.6 h1.52
  text "Round" at 34.36,109.6 h1.52
  text "Top Layer - Bottom Layer" at 52.999,109.6 h1.52
  text "Pad" at 91.088,109.6 h1.52
  text "Rounded" at 106.07,109.6 h1.52
  text "c150h90" at 125.013,109.6 h1.52
  text "-" at 153.961,109.6 h1.52
  text "-" at 181.638,109.6 h1.52
  text "5" at -21.657,105.79 h1.52
  text "37.40mil (0.950mm)" at -6.929,105.79 h1.52
  text "PTH" at 21.511,105.79 h1.52
  text "Round" at 34.36,105.79 h1.52
  text "Top Layer - Bottom Layer" at 52.999,105.79 h1.52
  text "Pad" at 91.088,105.79 h1.52
  text "(Mixed)" at 106.07,105.79 h1.52
  text "(Mixed)" at 125.013,105.79 h1.52
  text "-" at 153.961,105.79 h1.52
  text "-" at 181.638,105.79 h1.52
  text "8" at -21.657,101.98 h1.52
  text "40.35mil (1.025mm)" at -6.929,101.98 h1.52
  text "PTH" at 21.511,101.98 h1.52
  text "Round" at 34.36,101.98 h1.52
  text "Top Layer - Bottom Layer" at 52.999,101.98 h1.52
  text "Pad" at 91.088,101.98 h1.52
  text "Rounded" at 106.07,101.98 h1.52
  text "c168h102x0" at 125.013,101.98 h1.52
  text "-" at 153.961,101.98 h1.52
  text "-" at 181.638,101.98 h1.52
  text "4" at -21.657,98.17 h1.52
  text "118.11mil (3.000mm)" at -6.929,98.17 h1.52
  text "PTH" at 21.511,98.17 h1.52
  text "Round" at 34.36,98.17 h1.52
  text "Top Layer - Bottom Layer" at 52.999,98.17 h1.52
  text "Pad" at 91.088,98.17 h1.52
  text "Rounded" at 106.07,98.17 h1.52
  text "c500h300" at 125.013,98.17 h1.52
  text "-" at 153.961,98.17 h1.52
  text "-" at 181.638,98.17 h1.52
  text "116 Total" at -21.657,94.36 h1.52
  text "Slot definitions :" at -34.506,90.677 h1.52
  text "Routed Path Length" at -8.276,90.677 h1.52
  text "= Calculated from tool start centre position to tool end centre position." at 19.732,90.677 h1.52
  text "Hole Length" at -8.276,88.138 h1.52
  text "= Routed Path Length + Tool Size = Slot length as defined in the PCB layout" at 9.322,88.138 h1.52

## Dimensions
0,0 to 45.923,0.08 on DIMENSION
45.992,41.755 to 45.923,0.08 on DIMENSION
22.903,21.007 to -8.221,-10.117 on DIMENSION

## Text inside footprints (layer, text, board x,y; h text height)
J2: Top Overlay "Board Edge" at -10.352,24.53 h0.71 r270